# Altium PCB Urukul.PcbDoc (part 5 of 15)
Units mm, origin at the board's own origin, x right, y up, seen from the top; angles counter-clockwise.
Board outline 161.99 x 100 mm, 6 copper layers (L1, L2, L3, L4, P5, L6), stack 1.548 mm thick; 1078 components, 609 nets, 3798 pads, 2552 vias.
Unrouted connection lines stored in the file: 1.
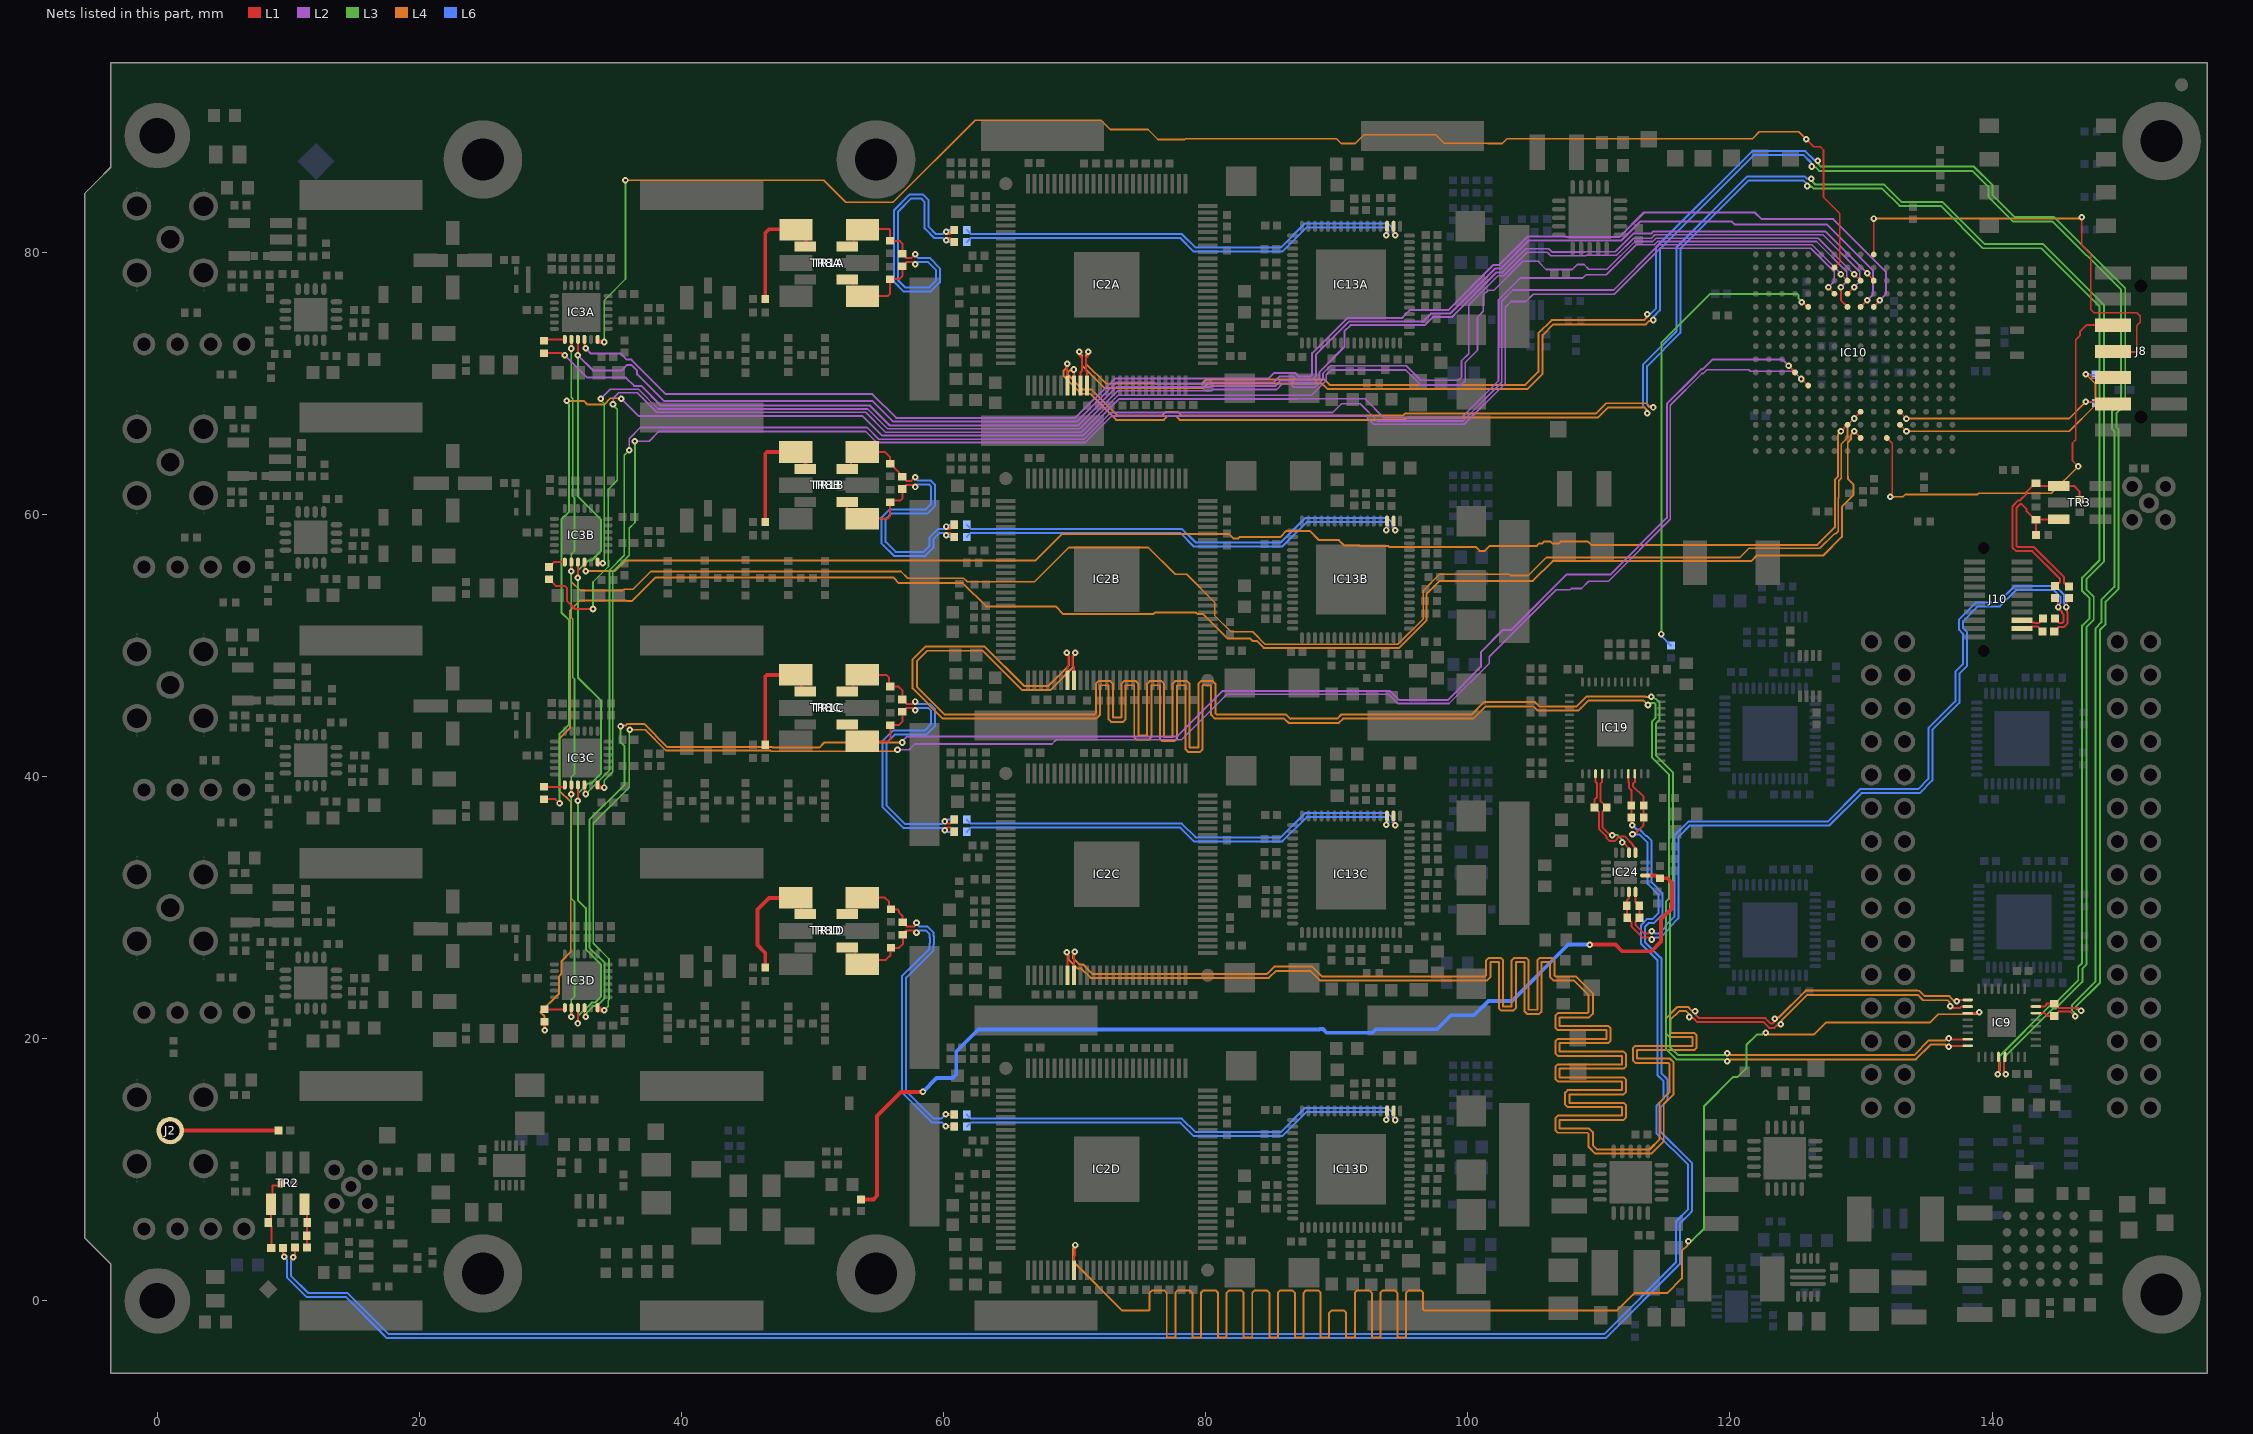
[diagram p8: the nets of this part, all layers, seen from the top]

## Part data (continued)
R136: library part R0603_7k5_1%_0.1W_100PPM, "Resistor - 1%", Case=0603, Manufacturer=GENERIC, Manufacturer1 ComponentHeight=0.55mm, Manufacturer1 Example="NIC COMPONENT", Manufacturer1 Part Number=NRC06F7501TRF, Manufacturer Part Number=R0603_7K5_1%_0.1W_100PPM, Power=0.1W, Tolerance=±1%, Author="CERN DEM JLC", Component Type=Standard, CreateDate=03.12.2007, HelpURL=\\cern.ch\dfs\Applications\Altium\Datasheets\R0603_NIC_NRC.pdf, LatestRevisionDate=13.03.2008, Mounted=Yes, Part Description="General Purpose Thick Film Chip Resistor", Part Number=R0603_7K5_1%_0.1W_100PPM, Pin Count=2, PressFit=No, Sense=No, SMD=Yes, Socket=No, Status=Preferred, TC=±100ppm/°C
R137A R137B R137C R137D: library part "R1206_100R_1%_0.5W_100PPM_VISHAY_CRCW-HP e3", "Resistor - 1%", Case=1206, Manufacturer="VISHAY DRALORIC", Manufacturer Part Number=CRCW1206100RFKEAHP, Power=0.5W, Tolerance=±1%, Voltage=200V, Author="CERN DEM JLC", ComponentHeight=0.65mm, Component Type=Standard, CreateDate=19.11.2013, HelpURL="\\cern.ch\dfs\Applications\Altium\Datasheets\R1206_VISHAY_CRCW-HP e3.pdf", LatestRevisionDate=19.11.2013, Mounted=Yes, Part Description="Pulse Proof, High Power Thick Film Chip Resistor", Part Number="R1206_100R_1%_0.5W_100PPM_VISHAY_CRCW-HP e3", Pin Count=2, PressFit=No, Sense=No, SMD=Yes, Socket=No, Status=None, TC=±100ppm/°C
R150 R151 R164: library part R0603_NO-VALUE, "Resistor", Case=0603, Author="CERN DEM JLC", Component Type=Standard, CreateDate=03.12.2007, HelpURL=Undefined, LatestRevisionDate=13.03.2008, Manufacturer=Undefined, Manufacturer1 ComponentHeight=Undefined, Manufacturer1 Example=Undefined, Manufacturer1 Part Number=Undefined, Manufacturer Part Number=R0603_NO-VALUE, Mounted=No, Part Description="Reserved Footprint For a 0603 (1608) Chip Resistor", Part Number=R0603_NO-VALUE, Pin Count=2, PressFit=No, Sense=No, SMD=Yes, Socket=No, Status=None
R166 R185 R186: library part R0603_47K_1%_0.1W_100PPM, "Resistor - 1%", Case=0603, Manufacturer=GENERIC, Manufacturer1 ComponentHeight=0.55mm, Manufacturer1 Example="NIC COMPONENT", Manufacturer1 Part Number=NRC06F4702TRF, Power=0.1W, Tolerance=±1%, Author="CERN DEM JLC", Component Type=Standard, CreateDate=03.12.2007, HelpURL=\\cern.ch\dfs\Applications\Altium\Datasheets\R0603_NIC_NRC.pdf, LatestRevisionDate=13.03.2008, Manufacturer Part Number=R0603_47K_1%_0.1W_100PPM, Mounted=Yes, Part Description="General Purpose Thick Film Chip Resistor", Part Number=R0603_47K_1%_0.1W_100PPM, Pin Count=2, Sense=No, SMD=Yes, Socket=No, Status=Preferred, TC=±100ppm/°C
R176: library part R0603_3K3_1%_0.1W_100PPM, "Resistor - 1%", Case=0603, Manufacturer=GENERIC, Manufacturer1 ComponentHeight=0.55mm, Manufacturer1 Example="NIC COMPONENT", Manufacturer1 Part Number=NRC06F3301TRF, Power=0.1W, Tolerance=±1%, Author="CERN DEM JLC", Component Type=Standard, CreateDate=03.12.2007, HelpURL=\\cern.ch\dfs\Applications\Altium\Datasheets\R0603_NIC_NRC.pdf, LatestRevisionDate=13.03.2008, Manufacturer Part Number=R0603_3K3_1%_0.1W_100PPM, Mounted=Yes, Part Description="General Purpose Thick Film Chip Resistor", Part Number=R0603_3K3_1%_0.1W_100PPM, Pin Count=2, PressFit=No, Sense=No, SMD=Yes, Socket=No, Status=Preferred, TC=±100ppm/°C
R194 R197: library part R0402_15K_1%_0.0625W_100PPM, "Resistor - 1%", Case=0402, Manufacturer=GENERIC, Manufacturer1 ComponentHeight=0.4mm, Manufacturer1 Example=VISHAY, Manufacturer1 Part Number=CRCW040215K0FK, Power=0.0625W, Tolerance=±1%, Author="CERN DEM JMW", Component Type=Standard, CreateDate=06.07.2015, HelpURL="\\cern.ch\dfs\Applications\Altium\Datasheets\R0402_VISHAY_CRCW e3.pdf", LatestRevisionDate=06.07.2015, Manufacturer Part Number=R0402_15K_1%_0.0625W_100PPM, Mounted=Yes, Part Description="General Purpose Thick Film Chip Resistor", Part Number=R0402_15K_1%_0.0625W_100PPM, Pin Count=2, PressFit=No, Sense=No, SMD=Yes, Socket=No, Status=None, TC=±100ppm/°C
R195: library part R0402_1K3_1%_0.0625W_100PPM, "Resistor - 1%", Case=0402, Manufacturer=GENERIC, Manufacturer1 ComponentHeight=0.4mm, Manufacturer1 Example="YAGEO PHYCOMP", Manufacturer1 Part Number=232270671302L, Power=0.0625W, Tolerance=±1%, Author="CERN DEM JLC", Component Type=Standard, CreateDate=03.12.2007, HelpURL=\\cern.ch\dfs\Applications\Altium\Datasheets\R0402_Phycomp_RC0402.pdf, LatestRevisionDate=17.10.2012, Manufacturer Part Number=R0402_1K3_1%_0.0625W_100PPM, Mounted=Yes, Part Description="General Purpose Thick Film Chip Resistor", Part Number=R0402_1K3_1%_0.0625W_100PPM, Pin Count=2, PressFit=No, Sense=No, SMD=Yes, Socket=No, Status="Not Recommended", TC=±100ppm/°C
R196: library part R0402_75K_1%_0.0625W_100PPM, "Resistor - 1%", Case=0402, Manufacturer=GENERIC, Manufacturer1 ComponentHeight=0.4mm, Manufacturer1 Example="YAGEO PHYCOMP", Manufacturer1 Part Number=232270677503L, Power=0.0625W, Tolerance=±1%, Author="CERN DEM JLC", Component Type=Standard, CreateDate=03.12.2007, HelpURL=\\cern.ch\dfs\Applications\Altium\Datasheets\R0402_Phycomp_RC0402.pdf, LatestRevisionDate=17.10.2012, Manufacturer Part Number=R0402_75K_1%_0.0625W_100PPM, Mounted=Yes, Part Description="General Purpose Thick Film Chip Resistor", Part Number=R0402_75K_1%_0.0625W_100PPM, Pin Count=2, PressFit=No, Sense=No, SMD=Yes, Socket=No, Status="Not Recommended", TC=±100ppm/°C
SW1: library part SW_OMRON_A6S-4102-H, "4 Ways SPST DIP Switch", Manufacturer=OMRON, Manufacturer Part Number=A6S-4102-H, Author="CERN DEM JMW", ComponentHeight=3.8mm, Component Type=Standard, CreateDate=25.09.2008, Family=Switch, HelpURL=\\cern.ch\dfs\Applications\Altium\Datasheets\SW_OMRON_A6S-4102-H.pdf, LatestRevisionDate=25.09.2008, Mounted=Yes, PackageDescription="Pitch 2.54mm, Body 11.3x6.4mm, 4 Ways SPST Surface-Mounting DIP Switch, OMRON A6S-H", Part Description="4 Ways SPST DIP Switch, White Flat Actuator with Seal Tape, Contact Rating 25mA 24VDC", Part Number=SW_OMRON_A6S-4102-H, Pin Count=8, PressFit=No, Sense=No, SMD=Yes, Socket=No, Status=None
T1: "P-CHANNEL MOSFET WITH DIODE", Case=SOT23-3, Manufacturer="ON SEMICONDUCTOR", Author="CERN DEM JLC", Bonding=No, ComponentHeight=1.1mm, Component Type=Standard, CreateDate=29.03.2012, Device=BSS84LT1G, HelpURL=\\cern.ch\dfs\Applications\Altium\Datasheets\BSS84LT1G.pdf, LatestRevisionDate=29.03.2012, Manufacturer Part Number=BSS84LT1G, Mounted=Yes, PackageDescription="SOT23 3-Leads, Pitch 0.95mm - Body 1.4x3mm, IPC Medium Density", Part Description="50V 130mA Single P-Channel Power MOSFET", Part Number=BSS84LT1G, Pin Count=3, PressFit=No, Sense=No, SMD=Yes, Socket=No
TP0 TP1 TP2 TP3 TP4 TP5 TP6 TP7 TP8 TP10 TP11 TP12 TP13 TP14 TP15 TP16 TP17 TP18: library part SMD_PAD_1.27X1.27MM, Author="CERN DEM JLC", ComponentHeight=0mm, Component Type="Standard (No BOM)", CreateDate=12.01.2008, Family="Test Point", HelpURL=Undefined, LatestRevisionDate=12.01.2008, Mounted=No, PackageDescription="1.27mm x 1.27mm PCB Copper Area (SMD Test Point)", Part Description="1.27mm x 1.27mm PCB Copper Area (SMD Test Point)", Part Number=SMD_PAD_1.27X1.27MM, Pin Count=1, Sense=No, SMD=Yes, Socket=No, Status=None
TR1A TR1B TR1C TR1D: library part XFMR_MINI-CIRCUITS_ADT1-1WT+, "75 Ohm 0.4 To 800MHz RF Transformers", Manufacturer=MINI-CIRCUITS, Manufacturer Part Number=ADT1-1WT+, Author="CERN DEM JLC", ComponentHeight=2.84mm, Component Type=Standard, CreateDate=21.09.2011, HelpURL=\\cern.ch\dfs\Applications\Altium\Datasheets\XFMR_MINI-CIRCUITS_ADT1-1WT+.pdf, LatestRevisionDate=21.09.2011, Mounted=Yes, Part Description="75 Ohms 0.4 to 800 MHz RF Transformer", Part Number=XFMR_MINI-CIRCUITS_ADT1-1WT+, Pin Count=6, Sense=No, SMD=Yes, Socket=No, Status=None
TR2 TR3: library part XFMR_MINI-CIRCUITS_TCM2-43X+, "50 OHMS 10 to 4000 MHz RF Transformer", Manufacturer=MINI-CIRCUITS, Manufacturer Part Number=TCM2-43X+, Power=0.4W, Author="CERN DEM BC", ComponentHeight=4.06mm, Component Type=Standard, CreateDate=2016-02-12, HelpURL=\\cern.ch\dfs\Applications\Altium\Datasheets\XFMR_MINI-CIRCUITS_TCM2-43X+.pdf, LatestRevisionDate=2016-02-12, Mounted=Yes, Part Description="50 Ohms 10 to 4000MHz RF Transformer", Part Number=XFMR_MINI-CIRCUITS_TCM2-43X+, Pin Count=6, Sense=No, SMD=Yes, Socket=No, Status=None
TR4 TR5 TR6 TR7: library part XFMR_MINI-CIRCUITS_TC1-1+, "50 Ohm 1.5 To 500MHz RF Transformers", Manufacturer=MINI-CIRCUITS, Manufacturer Part Number=TC1-1+, Author="CERN DEM JLC", ComponentHeight=4.06mm, Component Type=Standard, CreateDate=08/02/2010, HelpURL=\\cern.ch\dfs\Applications\Altium\Datasheets\XFMR_MINI-CIRCUITS_TC1-1+.pdf, LatestRevisionDate=27/04/2010, Mounted=Yes, Part Description="50 Ohms 1.5 to 500 MHz RF Transformer", Part Number=XFMR_MINI-CIRCUITS_TC1-1+, Pin Count=5, Sense=No, SMD=Yes, Socket=No, Status=None
TR8A TR8B TR8C TR8D: library part XFMR_MINI-CIRCUITS_TC1-1T-152X+, "50 Ohms 5 To 1500MHz TLT RF Transformer", Manufacturer=MINI-CIRCUITS, Manufacturer Part Number=TC1-1T-152X+, Author=GK, Component Type=Standard, ComponentHeight=4.06mm, CreateDate=10.08.2016, HelpURL=\\cern.ch\dfs\Applications\Altium\Datasheets\XFMR_MINI-CIRCUITS_TC1-1-43X+.pdf, LatestRevisionDate=10.08.2016, Mounted=Yes, Part Description="50 Ohms 5 To 1500MHz TLT RF Transformer", Part Number=XFMR_MINI-CIRCUITS_TC1-1T-152X+, Pin Count=5, Sense=No, SMD=Yes, Socket=No, Status=None
WASHER4 WASHER6 WASHER7 WASHER8 WASHER9: library part Keystone_7687, "SMA_Shoulder Washer", Author=GK, Component Type=Mechanical, ComponentHeight=1.91mm, CreateDate=28.01.2016, HelpURL=\\cern.ch\dfs\Applications\Altium\Datasheets\AAVID-THERMALLOY_7721-7PPSG.pdf, LatestRevisionDate=28.01.2016, Manufacturer="Custom 3D printed", Manufacturer Part Number="Custom 3D printed", Mounted=Yes, PackageDescription="Polyphenylene Sulfide PPS Shoulder Washer", Part Description="Polyphenylene Sulfide PPS Shoulder Washer", Part Number="Custom 3D printed", Pin Count=0, PressFit=No, Sense=No, SMD=No, Socket=No, Status=None
NT1 NT2 NT3 NT4 NT5 NT6 NT7 NT8 NT9 NT10 NT11 NT12 NT13 NT14 NT15 NT16 NT17 NT18 NT19 NT20: Author="CERN DEM JLC", Component Type="Net Tie", ComponentHeight=0mm, CreateDate=22.03.2011, Family="Net Tie", HelpURL=Undefined, LatestRevisionDate=22.03.2011, Mounted=No, PackageDescription="2 Plated Through Hole For Coaxial Cable Link: Hole Dia.=1.4mm Pad Dia.=2.5mm", Part Description="Net Tie (2 Nets)", Part Number="Net Tie", Pin Count=2, Sense=No, SMD=No, Socket=No, Status=None

## Free pads (board coordinates)
  round 6 hole 3.2: 0(54.844,2.088) 0(152.944,0.488) 0(152.944,88.488) 1(54.844,87.088) 2(24.844,87.088) 3(24.844,2.088)

## Via types
v1: diameter 0.5, hole 0.2, L1 to L6, tented both sides, 1964 vias
v2: diameter 0.5, hole 0.2, L1 to L6, 480 vias
v3: diameter 0.6, hole 0.3, L1 to L6, tented both sides, 52 vias
v4: diameter 0.6, hole 0.3, L1 to L6, 36 vias
v5: diameter 0.762, hole 0.508, L1 to L6, tented both sides, 20 vias

## Nets (pads, with @x,y where several pads share a name; then routed paths per layer and width w, separated by ;. In a path a pad name is that pad's centre, name@x,y a point inside that pad or via, vN(x,y) a via of type N, cw(c..) or ccw(c..) an arc to the next point about the centre after c; other vN are vias at no path point)
ATT_CLK: IC3A.21 IC3B.21 IC3C.21 IC3D.21 IC10.E9 | length 174.3
  L1 w0.152: v1(32.094,21.163) IC3D.21@32.094,22.363 ; v1(32.094,38.163) IC3C.21@32.094,39.363 ; v1(32.094,55.163) IC3B.21@32.094,56.363 ; v1(32.094,72.163) IC3A.21@32.094,73.363 ; IC10.E9@129.97,75.841 v1(130.47,76.341)
  L2 w0.152: v1(32.094,72.163) 33.269,70.988 35.428,70.988 35.828,71.388 36.199,71.388 36.62,70.968 36.62,70.687 38.644,68.663 54.564,68.663 56.144,67.083 70.16,67.083 73.161,70.084 76.081,70.084 76.173,69.992 80.233,69.992 80.325,70.084 85.189,70.084 85.623,70.519 86.699,70.519 86.953,70.265 88.115,70.265 88.404,70.554 88.404,72.191 90.943,74.73 96.599,74.73 97.202,75.334 98.643,75.334 102.071,78.762 102.513,78.762 104.667,80.916 106.982,80.916 106.992,80.906 111.699,80.906 113.134,82.341 120.152,82.341 120.355,82.138 127.373,82.138 130.923,78.587 130.923,76.794 v1(130.47,76.341)
  L3 w0.152: v1(32.094,21.163) 32.094,21.706 33.143,22.755 33.398,22.755 33.847,23.205 33.847,25.676 32.694,26.829 32.694,29.962 32.094,30.561 v1(32.094,38.163) 32.094,38.706 32.876,39.489 33.131,39.489 33.847,40.205 33.847,45.808 32.094,47.561 v1(32.094,55.163) 32.094,55.706 32.876,56.489 33.131,56.489 33.847,57.205 33.847,57.622 33.847,58.122 33.847,58.622 33.847,59.122 33.847,59.622 32.094,61.375 v1(32.094,72.163)
ATT_LE0: IC3A.22 IC10.E10 | length 114.7
  L1 w0.152: IC3A.22@32.594,73.363 32.594,72.774 v1(32.698,72.67) ; IC10.E10@130.97,75.841 130.97,75.854 131.35,76.234 v1@131.35,76.341
  L2 w0.152: v1(32.698,72.67) 33.094,72.274 35.39,72.274 35.39,72.251 35.828,71.813 36.169,71.813 38.794,69.188 54.564,69.188 56.38,67.373 70.055,67.373 73.045,70.363 84.778,70.363 85.212,70.798 86.815,70.798 87.068,70.544 88,70.544 88.125,70.67 88.125,72.307 90.828,75.009 94.995,75.009 95.599,75.613 98.527,75.613 101.955,79.041 102.397,79.041 104.552,81.195 107.476,81.195 107.486,81.185 111.584,81.185 113.442,83.044 121.908,83.044 122.421,82.531 127.895,82.531 131.897,78.528 131.897,76.794 v1(131.444,76.341)
ATT_LE1: IC3B.22 IC10.P8 | length 107.5
  L1 w0.152: IC3B.22@32.594,56.363 32.594,55.774 v1(32.698,55.67) ; v1(128.47,66.351) 128.475,66.351 128.965,66.841 IC10.P8@128.97,66.841
  L4 w0.152: v1(32.698,55.67) 34.918,55.67 35.731,56.483 66.999,56.483 69.037,58.522 81.77,58.522 82.106,58.185 82.482,58.185 82.589,58.293 85.708,58.293 86.16,58.745 87.938,58.745 88.641,58.042 90.165,58.042 90.576,57.631 91.724,57.631 91.748,57.607 93.921,57.607 93.994,57.534 100.599,57.534 100.904,57.229 101.279,57.229 101.657,57.607 102.782,57.607 105.26,57.607 105.444,57.791 105.688,57.791 105.843,57.946 106.301,57.946 106.457,57.791 106.954,57.791 107.106,57.943 109.164,57.943 109.424,57.682 126.672,57.682 128.002,59.013 128.002,61.354 128.032,61.384 128.032,62.681 128.231,62.881 128.231,66.088 128.47,66.327 v1(128.47,66.351)
ATT_LE2: IC3C.22 IC10.C8 | length 134.9
  L1 w0.127: v1(128.47,78.341) IC10.C8@128.97,77.841
  L1 w0.152: IC3C.22@32.594,39.363 32.594,38.774 v1(32.698,38.67)
  L2 w0.127: v1(36.004,64.888) 36.003,65.778 36.86,66.635 54.168,66.635 55.052,65.751 70.712,65.751 72.74,67.779 89.685,67.779 90.359,68.453 91.787,68.453 93.107,67.133 99.626,67.133 102.595,70.101 102.595,76.282 103.44,77.128 111.129,77.128 114.573,80.572 126.266,80.572 128.47,78.368 v1(128.47,78.341)
  L3 w0.127: v1(32.698,38.67) 34.499,40.471 34.499,55.746 35.634,56.88 35.634,64.518 v1(36.004,64.888)
ATT_LE3: IC3D.22 IC10.K4 | length 134.9
  L1 w0.152: IC3D.22@32.594,22.363 32.594,21.774 v1(32.698,21.67) ; v1(124.47,71.359) 124.47,71.35 124.97,70.85 IC10.K4@124.97,70.841
  L2 w0.152: v1(56.839,42.6) 56.839,42.695 57.214,43.07 77.834,43.07 81.309,46.545 94.049,46.545 94.756,45.838 98.45,45.838 100.986,48.374 100.986,49.502 102.669,51.184 103.295,51.184 107.519,55.409 110.853,55.409 115.189,59.745 115.189,68.451 117.152,70.414 117.826,71.088 117.928,71.088 118.652,71.812 124.017,71.812 v1(124.47,71.359)
  L3 w0.152: v1(32.698,21.67) 32.761,21.733 32.761,21.979 33.259,22.476 33.513,22.476 34.126,23.089 34.126,25.792 32.973,26.945 32.973,36.702 35.657,39.386 35.657,42.301 35.348,42.611 v1(35.348,43.846)
  L4 w0.152: v1(35.348,43.846) 35.414,43.912 35.747,43.912 35.856,44.021 37.145,44.021 38.912,42.255 46.919,42.255 46.955,42.219 46.964,42.21 50.507,42.21 50.896,42.6 v1(56.839,42.6)
ATT_RSTN: IC3A.20 IC3B.20 IC3C.20 IC3D.20 IC10.N9 | length 172.6
  L1 w0.127: v1@129.47,67.292 129.47,67.332 129.97,67.832 IC10.N9@129.97,67.841
  L1 w0.152: v1(31.594,21.663) IC3D.20@31.594,22.363 ; v1(31.594,38.663) IC3C.20@31.594,39.363 ; v1(31.594,55.663) IC3B.20@31.594,56.363 ; v1(31.594,72.663) IC3A.20@31.594,73.363
  L3 w0.127: v1(31.594,21.663) 31.594,22.97 31.834,23.21 31.834,30.444 31.594,30.684 31.594,38.641 31.616,38.663 31.594,38.685 31.594,39.97 31.834,40.21 31.834,47.444 31.692,47.586 31.692,52.03 31.594,52.128 31.594,55.641 31.616,55.663 31.594,55.685 31.594,56.97 31.834,57.21 31.834,61.257 31.692,61.4 31.692,68.842 31.594,68.94 v1(31.594,72.663)
  L4 w0.127: v1(31.594,55.663) 31.594,54.868 32.264,54.198 35.501,54.198 35.609,54.305 36.297,54.305 37.643,55.651 56.744,55.651 57.252,55.143 61.519,55.143 61.789,54.873 66.938,54.873 69.546,57.481 70.626,57.481 70.628,57.48 71.26,57.48 71.262,57.481 75.615,57.481 77.666,55.43 78.552,55.43 80.674,53.308 80.674,52.292 81.922,51.045 83.577,51.045 84.526,50.096 94.652,50.096 96.586,52.03 96.586,54.185 97.832,55.43 98.716,55.43 98.729,55.443 103.137,55.443 103.237,55.343 104.602,55.343 105.972,56.713 120.749,56.713 121.452,57.416 126.848,57.416 127.973,58.541 128.082,58.541 128.269,58.727 128.269,61.244 128.299,61.274 128.299,62.571 128.498,62.77 128.498,65.379 128.965,65.846 128.965,66.818 v1(129.47,67.324)
ATT_S_IN0: IC3A.24 IC10.B7 | length 120.3
  L1 w0.127: v1(125.831,88.62) 126.384,88.066 126.878,88.066 127.136,87.808 127.136,84.215 128.386,82.966 128.386,79.256 IC10.B7@127.97,78.841
  L1 w0.3: IC3A.24@33.594,73.363 33.582,73.352 33.771,73.163 v1(34.094,73.163)
  L3 w0.127: v1(34.094,73.163) 34.094,76.333 35.723,77.962 v1(35.723,85.499)
  L4 w0.127: v1(35.723,85.499) 50.847,85.499 52.527,83.819 56.134,83.819 62.407,90.093 72.002,90.093 72.721,89.373 73.09,89.373 73.099,89.382 75.59,89.382 76.36,88.611 78.399,88.611 78.458,88.67 89.983,88.67 90.345,88.308 91.405,88.308 92.08,88.983 97.563,88.983 98.208,88.338 101.511,88.338 101.54,88.308 102.626,88.308 102.988,88.67 121.716,88.67 122.24,89.194 125.257,89.194 v1(125.831,88.62)
ATT_S_IN1: IC3B.24 IC10.D8 | length 124.7
  L1 w0.127: IC10.D8@128.97,76.841 129.408,77.279 v1@129.47,77.279
  L1 w0.3: IC3B.24@33.594,56.363 33.594,56.303 33.952,56.303 v1(33.99,56.265)
  L2 w0.127: v1(33.847,68.84) 34.554,69.548 36.712,69.548 38.211,68.049 54.207,68.049 55.718,66.538 70.386,66.538 73.294,69.446 80.459,69.446 80.551,69.539 85.415,69.539 85.849,69.973 86.473,69.973 86.727,69.72 88.341,69.72 88.95,70.328 88.95,70.766 89.524,71.34 95.303,71.34 96.405,70.238 99.282,70.238 99.521,70.476 99.521,71.719 100.069,72.268 100.069,75.988 102.297,78.216 102.739,78.216 104.533,80.01 106.056,80.01 106.323,79.744 109,79.744 109.038,79.781 111.346,79.781 112.651,81.087 114.01,81.087 114.258,81.334 127.099,81.334 129.91,78.523 129.91,77.781 v1(129.47,77.341)
  L3 w0.127: v1(33.847,68.84) 33.847,68.739 34.114,68.473 34.114,56.489 33.99,56.366 v1(33.99,56.265)
ATT_S_IN2: IC3C.24 IC10.D7 | length 133
  L1 w0.127: v1(127.515,77.35) 127.515,77.323 127.97,76.868 IC10.D7@127.97,76.841
  L1 w0.3: IC3C.24@33.594,39.363 33.59,39.359 33.786,39.163 v1(34.094,39.163)
  L2 w0.127: v1(36.444,65.596) 37.529,65.596 38.262,66.329 54.055,66.329 54.887,65.497 70.817,65.497 72.836,67.516 92.191,67.516 92.829,66.879 99.731,66.879 102.849,69.996 102.849,75.806 103.29,76.247 104.441,76.247 105.001,76.807 111.167,76.807 114.678,80.318 126.161,80.318 127.956,78.523 127.956,77.791 v1(127.515,77.35)
  L3 w0.127: v1(34.094,39.163) 34.094,39.706 34.753,40.366 34.753,55.641 36.003,56.891 36.003,58.948 36.444,59.388 36.444,62.483 v1(36.444,65.596)
ATT_S_IN3: IC3D.24 IC10.L5 | length 132.9
  L1 w0.127: v1(125.431,70.338) 125.452,70.338 125.949,69.841 IC10.L5@125.97,69.841
  L1 w0.3: IC3D.24@33.594,22.363 33.644,22.413 33.894,22.163 v1(34.094,22.163)
  L2 w0.127: v1(56.479,42.038) 57.371,42.038 57.821,42.488 68.271,42.488 68.587,42.804 78.149,42.804 81.624,46.279 93.939,46.279 94.646,45.571 98.561,45.571 101.622,48.633 101.622,49.134 106.738,54.251 107.793,54.251 107.889,54.347 108.672,54.347 109.235,54.909 110.731,54.909 115.456,59.635 115.456,68.341 117.867,70.752 117.969,70.752 118.25,71.033 121.443,71.033 121.557,70.918 124.851,70.918 v1(125.431,70.338)
  L3 w0.127: v1(34.094,22.163) 34.403,22.473 34.403,22.896 34.468,22.96 34.468,26.077 33.274,27.271 33.274,36.434 36.003,39.164 36.003,43.528 v1(36.044,43.568)
  L4 w0.127: v1(36.044,43.568) 37.221,43.568 38.802,41.988 46.809,41.988 46.853,41.944 56.313,41.944 56.408,42.038 v1(56.479,42.038)
ATT_S_OUT0: IC10.C10 R100.1 | length 112.8
  L1 w0.152: R100.1@29.51,72.304 30.834,72.304 31,72.138 v1(31.094,72.138) ; v1@130.47,78.343 130.497,78.343 130.97,77.87 IC10.C10@130.97,77.841
  L2 w0.152: v1(31.094,72.138) 32.791,70.441 35.75,70.441 36.377,69.814 36.912,69.814 38.411,68.316 54.358,68.316 55.87,66.804 70.275,66.804 73.184,69.713 80.348,69.713 80.441,69.805 85.304,69.805 85.739,70.24 86.584,70.24 86.837,69.986 88.231,69.986 88.683,70.438 88.683,70.876 90.584,72.777 90.584,73.976 91.059,74.451 96.715,74.451 97.318,75.055 98.758,75.055 102.186,78.483 102.628,78.483 104.422,80.277 106.167,80.277 106.433,80.01 108.89,80.01 108.927,80.048 111.235,80.048 112.623,81.435 113.982,81.435 114.147,81.601 127.269,81.601 v1(130.47,78.4)
ATT_S_OUT1: IC10.C9 R169.1 | length 131
  L1 w0.127: v1(129.47,78.341) IC10.C9@129.97,77.841
  L1 w0.152: R169.1@29.898,55.053 30.39,54.561 31.094,54.561 31.247,54.408 31.247,53.413 31.872,52.788 v1(33.244,52.788)
  L2 w0.127: v1(34.77,68.416) 34.793,68.439 34.793,68.866 35.208,69.281 36.62,69.281 38.105,67.795 54.055,67.795 55.567,66.284 70.491,66.284 73.299,69.092 88.073,69.092 89.204,70.223 89.204,70.661 89.565,71.022 95.262,71.022 96.398,69.886 99.483,69.886 99.794,70.197 99.794,71.597 100.732,72.535 100.732,75.046 101.185,75.499 101.185,76.745 101.551,77.111 101.993,77.111 104.194,79.313 105.355,79.313 105.97,78.698 107.976,78.698 108.357,79.079 108.859,79.079 109.237,78.701 110.624,78.701 112.756,80.833 114.115,80.833 114.363,81.08 126.73,81.08 v1(129.47,78.341)
  L3 w0.127: v1(33.244,52.788) 33.244,54.849 34.431,56.036 34.431,56.503 34.403,56.531 34.403,61.904 35.106,62.606 35.106,68.026 34.77,68.361 v1(34.77,68.416)
ATT_S_OUT2: IC10.E8 R170.1 | length 147
  L1 w0.152: R170.1@29.51,38.278 30.376,38.278 v1(30.692,37.962) ; v1(128.47,77.35) 128.47,76.341 IC10.E8@128.97,75.841
  L2 w0.127: 86.973,68.826 92.149,68.826 93.588,67.387 99.521,67.387 102.341,70.207 102.341,76.388 103.996,78.043 108.772,78.043 109.015,78.286 110.569,78.286 112.862,80.579 114.22,80.579 114.468,80.826 126.607,80.826 128.911,78.523 128.911,77.791 v1(128.47,77.35)
  L2 w0.152: v1(35.39,68.84) 36.702,67.529 53.795,67.529 55.306,66.017 70.601,66.017 73.41,68.826 86.973,68.826
  L3 w0.152: v1(30.692,37.962) 30.692,43.271 31.426,44.004 31.426,51.92 30.841,52.504 30.841,59.622 31.426,60.206 31.426,68.391 31.245,68.572 v1(31.245,68.666)
  L4 w0.152: v1(31.245,68.666) 32.548,68.666 32.826,68.387 34.094,68.387 34.576,68.869 35.362,68.869 v1(35.39,68.84)
ATT_S_OUT3: IC10.R9 R147.1 | length 149.3
  L1 w0.152: v1@29.594,20.663 R147.1@29.594,21.363 ; v1@129.564,66.351 v1(129.47,66.351) 129.47,66.341 IC10.R9@129.97,65.841
  L4 w0.152: v1(29.554,20.638) 29.554,21.695 29.235,22.013 30.632,23.41 30.632,24.74 30.841,24.948 30.841,25.916 31.547,26.622 31.547,38.07 30.683,38.933 30.683,42.901 31.496,43.713 31.496,52.68 32.258,53.441 35.75,53.441 35.806,53.385 36.215,53.385 38.003,55.173 56.18,55.173 56.591,54.762 61.468,54.762 63.243,52.988 68.549,52.988 69.142,52.395 76,52.395 76.121,52.516 79.257,52.516 79.378,52.395 79.81,52.395 81.687,50.518 83.41,50.518 83.566,50.363 83.882,50.363 84.415,49.83 94.763,49.83 96.853,51.92 96.853,53.944 97.844,54.935 104.956,54.935 106.468,56.446 107.489,56.446 121.614,56.446 122.039,56.871 127.115,56.871 128.535,58.291 128.535,60.596 129.441,61.502 129.441,61.878 129.423,61.896 129.423,62.022 129.442,62.04 129.442,62.284 128.989,62.737 128.989,62.89 128.988,65.493 129.231,65.736 129.231,66.088 129.47,66.327 v1(129.47,66.351)
ATT_S_OUTA: IC3A.19 R100.2 | length 1.6
  L1 w0.152: R100.2@29.51,73.244 29.629,73.363 IC3A.19@31.094,73.363
ATT_S_OUTB: IC3B.19 R169.2 | length 1.3
  L1 w0.152: R169.2@29.898,55.993 30.268,56.363 IC3B.19@31.094,56.363
ATT_S_OUTC: IC3C.19 R170.2 | length 1.7
  L1 w0.152: R170.2@29.51,39.218 31.026,39.218 31.094,39.287 IC3C.19@31.094,39.363
ATT_S_OUTD: IC3D.19 R147.2 | length 1.7
  L1 w0.152: R147.2@29.554,22.244 31.092,22.244 31.094,22.246 IC3D.19@31.094,22.363
CFG_TCK: IC10.P12 J8.6 R67.1 | length 21.5
  L1 w0.127: IC10.P12@132.97,66.841 v1(133.47,66.341) ; v1(147.159,70.713) 147.396,70.713 147.669,70.44 J8.6@149.244,70.44
  L4 w0.127: v1(133.47,66.341) 145.884,66.341 147.894,68.351 147.894,69.978 v1(147.159,70.713)
  L6 w0.127: v1@147.153,70.663 R67.1@147.874,70.663
CFG_TDI: IC10.R11 J8.10 | length 33.5
  L1 w0.127: IC10.R11@131.97,65.841 132.386,65.425 132.386,61.607 132.22,61.442 v1(132.22,61.341) ; v1(146.569,63.663) 146.144,64.089 146.144,65.456 146.394,65.706 146.394,73.34 146.719,73.665
  L1 w0.152: 146.719,73.665 146.719,73.965 147.194,74.44 J8.10@149.244,74.44
  L4 w0.127: v1(132.22,61.341) 133.189,61.341 133.379,61.531 138.908,61.531 138.986,61.609 144.515,61.609 v1(146.569,63.663)
CFG_TDO: IC10.A10 J8.8 | length 34.6
  L1 w0.127: IC10.A10@130.97,79.841 v1(130.97,82.581) ; v1(146.834,82.686) 146.834,80.54 147.532,79.842 147.532,79.377 147.532,75.64 147.779,75.393 151.045,75.393 151.302,75.136 151.302,74.678 151.045,74.421 151.045,72.467 150.971,72.393 149.291,72.393 J8.8@149.244,72.44
  L4 w0.127: v1(130.97,82.581) 146.729,82.581 v1(146.834,82.686)
CFG_TMS: IC10.N12 J8.4 R66.1 | length 18
  L1 w0.127: IC10.N12@132.97,67.841 132.97,67.815 133.468,67.317 v1(133.468,67.291) ; v1(147.159,68.593) 149.091,68.593 J8.4@149.244,68.44
  L4 w0.127: v1(133.468,67.291) 133.506,67.329 145.895,67.329 v1(147.159,68.593)
  L6 w0.127: v1(147.159,68.593) R66.1@148.007,68.593
CK_MMCX_IN_N: C194.1 C195.1 R45.2 TR3.4 | length 13.5
  L1 w0.152: C195.1@143.291,59.586 143.349,59.527 R45.2@143.349,58.438 ; C195.1@143.34,59.592 143.285,59.592 142.635,60.241 142.635,60.403 142.257,60.781 142.131,60.781 141.866,60.516 141.866,57.59 141.955,57.501 143.202,57.501 145.499,55.203 145.499,54.786 145.589,54.697 145.685,54.697 C194.1@145.869,54.513 ; C195.1@143.34,59.635 TR3.4@145.097,59.635
CK_MMCX_IN_P: C189.1 C191.2 R73.2 TR3.6 | length 15.4
  L1 w0.152: C189.1@144.794,54.538 145.028,54.772 145.105,54.772 145.195,54.861 145.195,55.077 143.076,57.196 141.829,57.196 141.561,57.464 141.561,60.642 142.005,61.085 142.131,61.085 142.635,61.589 142.635,61.751 143.285,62.401 C191.2@143.34,62.401 143.566,62.175 TR3.6@145.097,62.175 146.258,62.175 146.687,61.745 R73.2@146.687,61.125
CK_MMCX_N: C194.2 C214.1 IC24.4 R47.1 R163.2 | length 61.1
  L1 w0.152: IC24.4@112.793,31.196 112.793,30.423 R47.1@113.071,30.144 113.097,30.119 R163.2@113.097,29.23 113.097,29.21 112.883,28.996 112.868,28.996 112.779,28.907 112.779,28.691 113.436,28.034 113.789,28.034 113.95,28.195 v1(114.044,28.195) ; C214.1@144.744,51.063 144.978,51.297 144.978,51.311 145.067,51.4 145.47,51.4 145.737,51.668 145.737,52.51 145.736,52.512 145.736,52.872 v1(145.669,52.938) 145.669,53.413 C194.2@145.869,53.613
  L6 w0.152: v1(114.044,28.195) 114.138,28.195 114.299,28.034 114.577,28.034 115.09,28.548 115.09,28.643 115.755,29.308 115.755,35.505 116.82,36.571 127.451,36.571 129.924,39.043 134.356,39.043 135.144,39.831 135.144,43.694 137.195,45.745 137.195,47.983 137.769,48.557 137.769,50.915 137.489,51.194 137.489,51.99 138.792,53.292 140.473,53.292 141.724,54.543 144.82,54.543 145.508,53.855 145.508,53.193 145.669,53.032 v1(145.669,52.938)
CK_MMCX_P: C189.2 C213.1 IC24.3 R47.2 R163.1 | length 60.7
  L1 w0.152: IC24.3@112.293,31.196 112.293,30.703 112.157,30.567 R163.1@112.157,29.23 112.157,29.21 112.371,28.996 112.385,28.996 112.474,28.907 112.474,28.565 113.31,27.73 113.789,27.73 113.95,27.568 v1(114.044,27.568) ; C213.1@144.794,52.063 145.028,51.829 145.028,51.795 145.117,51.705 145.343,51.705 145.433,51.795 145.433,52.383 145.324,52.492 145.324,52.584 145.042,52.866 v1(145.042,52.938) 145.028,52.952 145.028,53.404 C189.2@144.794,53.638
  L6 w0.152: v1(114.044,27.568) 114.138,27.568 114.299,27.73 114.703,27.73 115.395,28.421 115.395,28.517 116.06,29.182 116.06,35.379 116.947,36.266 127.578,36.266 130.05,38.738 134.482,38.738 135.449,39.705 135.449,43.568 137.5,45.619 137.5,47.857 138.074,48.431 138.074,51.041 137.794,51.32 137.794,51.863 138.918,52.987 140.599,52.987 141.85,54.238 144.694,54.238 145.203,53.729 145.203,53.193 145.042,53.032 v1(145.042,52.938)
CK_OSC: C103.1 IC24.6 R162.1 | length 81.1
  L1 w0.298: C103.1@53.699,7.741 54.647,7.741 54.919,8.013 54.919,14.113 56.752,15.946 v1(58.423,15.946) ; v1@109.349,27.149 109.377,27.177 111.262,27.177 111.768,26.67 114.009,26.67 114.744,27.405 114.744,29.12 115.571,29.947 115.571,31.889 115.22,32.24 R162.1@114.659,32.24 114.529,32.369 114.398,32.369 114.321,32.446 IC24.6@113.918,32.446
  L6 w0.298: v1(58.423,15.946) 59.466,16.988 60.669,16.988 60.964,17.283 60.964,19.013 62.639,20.688 88.644,20.688 88.7,20.744 88.938,20.744 89.229,20.453 92.727,20.453 92.995,20.721 97.648,20.721 98.716,21.788 100.461,21.788 101.564,22.891 103.36,22.891 107.661,27.193 108.727,27.193 108.743,27.177 v1(109.294,27.177)
CK_SMA_IN: C196.1 J2.1 | length 8.3
  L1 w0.298: J2.1@0.984,12.988 C196.1@9.244,12.988
CK_SMA_IN_N: C80.1 C81.1 R81.2 TR2.4 | length 3.4
  L1 w0.152: TR2.4@11.214,7.373 11.419,7.168 11.419,5.963 11.419,4.963 C81.1@11.419,4.063
CK_SMA_IN_P: C54.1 C69.2 R46.2 TR2.6 | length 5.7
  L1 w0.152: C54.1@8.694,4.038 8.694,5.723 C69.2@8.454,5.963 8.674,6.183 TR2.6@8.674,7.373 8.805,7.504 8.805,8.785 9.296,8.785 R46.2@9.474,8.963
CK_SMA_N: C81.2 IC19.20 R22.2 R52.1 | length 154.8
  L1 w0.152: v1@10.197,3.155 v1(10.358,3.316) 10.519,3.477 C81.2@10.519,4.063 ; v1@112.601,35.489 112.563,35.528 v1(112.563,35.605) 112.717,35.605 113.414,36.302 R22.2@113.414,36.888 R52.1@113.414,37.788 113.414,38.452 112.598,39.268 112.598,39.441 112.744,39.587 IC19.20@112.744,40.213
  L6 w0.152: v1(10.358,3.316) 10.194,3.152 10.194,1.919 11.536,0.577 14.53,0.577 14.619,0.488 17.649,-2.542 110.393,-2.542 115.882,2.947 115.882,6.053 116.817,6.988 116.817,10.365 114.389,12.793 114.389,14.864 114.944,15.419 114.944,16.738 114.473,17.21 114.473,25.849 114.473,25.979 113.214,27.237 113.214,28.664 113.696,29.146 114.093,29.146 114.535,29.588 114.535,30.986 113.714,31.807 113.714,34.966 113.089,35.591 112.576,35.591 112.563,35.578 v1(112.563,35.605)
CK_SMA_P: C54.2 IC19.19 R22.1 R52.2 | length 154.5
  L1 w0.152: v1@9.594,3.452 C54.2@9.594,4.038 ; IC19.19@112.244,40.213 112.244,39.587 112.293,39.538 112.293,39.141 112.474,38.961 R52.2@112.474,37.788 R22.1@112.474,36.888 v1@112.474,36.302
  L6 w0.152: v1(9.689,3.358) 9.88,3.168 9.88,2.498 9.889,2.488 9.889,1.793 11.41,0.273 14.403,0.273 17.222,-2.545 17.523,-2.847 110.519,-2.847 116.187,2.821 116.187,5.927 117.033,6.773 117.122,6.862 117.122,10.491 117.033,10.581 114.694,12.919 114.694,14.738 115.249,15.293 115.249,16.864 115.157,16.956 115.157,16.967 114.785,17.339 114.785,25.979 114.785,26.108 114.699,26.194 114.688,26.194 113.519,27.363 113.519,28.538 113.822,28.841 114.219,28.841 114.84,29.462 114.84,31.112 114.019,31.933 114.019,35.092 113.635,35.476 ; v1(112.551,36.291) 112.877,35.965 113.111,35.965 113.617,35.458
CLK_DIV: IC10.E5 R155.1 | length 36.8
  L1 w0.152: v1(125.47,76.2) 125.54,76.2 125.9,75.841 IC10.E5@125.97,75.841
  L3 w0.152: v1(114.76,50.877) 114.76,73.118 118.483,76.84 125.131,76.84 125.22,76.751 125.22,76.498 125.47,76.247 v1(125.47,76.2)
  L6 w0.152: v1(114.76,50.877) 114.76,50.734 R155.1@115.492,50.002
CLKM_N: IC19.15 IC24.10 R17.2 | length 7.8
  L1 w0.152: IC19.15@110.244,40.213 110.244,39.587 110.134,39.477 110.134,38.105 R17.2@110.601,37.638 110.27,37.308 110.27,36.135 110.872,35.534 v1(111.027,35.534) ; v1(111.79,34.973) 111.866,34.973 112.293,34.546 IC24.10@112.293,34.196
  L3 w0.15: v1(111.027,35.534) 111.428,35.534 111.89,35.072 v1(111.79,34.973) v1(111.79,34.973)
  L4 w0.15: v1(111.027,35.534) v1@111.027,35.647
CLKM_P: IC19.14 IC24.9 R17.1 | length 8.6
  L1 w0.152: IC19.14@109.744,40.213 109.744,39.587 109.854,39.477 109.854,38.418 109.661,38.224 R17.1@109.661,37.638 109.991,37.308 109.991,36.019 110.573,35.437 110.573,35.346 110.839,35.081 111.214,35.081 111.56,35.427 111.994,35.427 111.994,35.422 112.598,34.818 112.598,34.741 112.793,34.546 IC24.9@112.793,34.196
CPCIS_CLK_N: C214.2 J10.17 | length 1.8
  L1 w0.152: J10.17@142.269,51.291 142.869,51.291 143.034,51.456 143.218,51.456 143.24,51.434 143.521,51.434 143.61,51.345 143.61,51.297 C214.2@143.844,51.063
CPCIS_CLK_P: C213.2 J10.15 | length 1.9
  L1 w0.152: J10.15@142.269,51.926 142.869,51.926 143.034,51.761 143.213,51.761 143.239,51.735 143.333,51.735 143.355,51.713 143.571,51.713 143.66,51.803 143.66,51.829 C213.2@143.894,52.063
DAC_OUT_SEA: R59A.1 TR1A.1 TR8A.6 | length 8.5
  L1 w0.298: R59A.1@46.39,76.431 46.39,81.488 46.667,81.765 48.692,81.765 TR1A.1@48.729,81.728 ; TR1A.1@49.444,81.413 49.489,81.368 TR8A.6@49.489,80.458
DAC_OUT_SEB: R59B.1 TR1B.1 TR8B.6 | length 9.2
  L1 w0.298: R59B.1@46.39,59.431 46.39,64.634 46.521,64.765 TR1B.1@48.714,64.765 48.775,64.765 49.454,64.086 TR8B.6@49.454,63.483
DAC_OUT_SEC: R59C.1 TR1C.1 TR8C.6 | length 9.1
  L1 w0.298: R59C.1@46.39,42.431 46.39,47.634 46.521,47.765 TR1C.1@48.714,47.765 49.163,47.316 49.163,46.799 TR8C.6@49.454,46.508
DAC_OUT_SED: R59D.1 TR1D.1 TR8D.6 | length 9.5
  L1 w0.298: R59D.1@46.39,25.431 46.39,26.542 45.794,27.138 45.794,29.868 46.66,30.734 48.044,30.734 48.075,30.765 TR1D.1@48.714,30.765 49.168,30.311 49.168,29.799 TR8D.6@49.454,29.513
DAC_OUTA_N: R8A.1 R38A.1 R78A.2 R91A.2 TR1A.4 TR8A.3 | length 26.7
  L1 w0.152: TR8A.3@52.669,77.918 52.973,77.615 53.119,77.615 TR1A.4@53.119,77.138 ; TR1A.4@53.809,76.648 53.846,76.685 55.755,76.685 55.919,76.849 R38A.1@55.919,77.954 56.618,77.954 56.844,78.18 R8A.1@56.844,78.943 57.162,79.261 57.67,79.261 v1(57.831,79.1) ; v1(60.198,80.924) 60.198,81.073 60.223,81.098 60.514,81.098 R78A.2@60.824,80.788
  L6 w0.152: v1(57.831,79.1) 58.002,79.271 58.801,79.271 59.414,78.658 59.414,77.846 58.906,77.338 57.052,77.338 56.518,77.871 56.518,83.103 57.534,84.119 58.271,84.119 58.55,83.84 58.55,81.834 59.286,81.098 59.948,81.098 v1@60.16,80.886 ; v1@60.258,80.788 R91A.2@60.824,80.788
DAC_OUTA_P: R8A.2 R54A.1 R56A.2 R79A.2 TR1A.6 TR8A.1 | length 28.7
  L1 w0.152: TR8A.1@53.144,80.613 53.144,81.063 TR1A.6@53.809,81.728 53.846,81.765 55.879,81.765 55.919,81.726 R54A.1@55.919,80.875 56.641,80.875 56.844,80.672 R8A.2@56.844,79.883 57.162,79.566 57.531,79.566 57.712,79.747 v1@57.831,79.747 ; v1(60.198,81.585) 60.198,81.429 60.223,81.403 60.514,81.403 R56A.2@60.824,81.713
  L6 w0.152: v1@57.86,79.747 58.032,79.576 58.927,79.576 59.719,78.785 59.719,77.719 59.032,77.033 56.925,77.033 56.213,77.745 56.213,83.23 57.408,84.424 58.397,84.424 58.855,83.966 58.855,81.96 59.412,81.403 59.948,81.403 v1@60.164,81.619 ; v1@60.258,81.713 R79A.2@60.824,81.713
  other v1: 57.831,79.847
DAC_OUTB_N: R8B.1 R38B.1 R78B.2 R91B.2 TR1B.4 TR8B.3 | length 24.5
  L1 w0.152: TR8B.3@52.634,60.943 52.634,60.223 TR1B.4@52.944,59.913 ; TR1B.4@53.794,59.685 55.722,59.685 55.893,59.856 55.893,60.961 56.095,60.961 56.191,61.057 56.688,61.057 56.844,61.213 R8B.1@56.844,61.943 57.162,62.261 57.67,62.261 v1(57.831,62.1) ; v1(60.198,58.42) 60.198,58.522 60.274,58.598 60.514,58.598 R78B.2@60.824,58.288
  L3 w0.15: v1(60.198,58.42) 60.23,58.452 v1@60.343,58.452
  L6 w0.152: v1(57.831,62.1) 58.002,62.271 58.907,62.271 59.026,62.152 59.026,60.77 58.652,60.396 55.894,60.396 55.274,59.775 55.274,57.78 56.214,56.84 58.6,56.84 58.69,56.929 59.211,57.45 59.211,58.104 59.705,58.598 60.02,58.598 v1(60.198,58.42) 60.258,58.36 60.258,58.288 R91B.2@60.824,58.288
DAC_OUTB_P: R8B.2 R54B.1 R56B.2 R79B.2 TR1B.6 TR8B.1 | length 23.3
  L1 w0.152: TR8B.1@52.634,63.483 52.919,63.768 TR1B.6@52.919,64.338 ; TR1B.6@53.794,64.765 55.531,64.765 55.919,64.378 55.919,63.882 56.844,62.957 R8B.2@56.844,62.883 57.162,62.566 57.531,62.566 57.712,62.747 v1@57.831,62.747 ; v1(60.198,59.08) 60.198,58.979 60.274,58.903 60.514,58.903 R56B.2@60.824,59.213
  L6 w0.152: v1@57.831,62.747 57.86,62.747 58.032,62.576 59.033,62.576 59.146,62.463 59.331,62.278 59.331,60.644 58.778,60.091 56.02,60.091 55.578,59.649 55.578,57.907 56.34,57.145 58.474,57.145 58.906,57.576 58.906,58.231 59.578,58.903 60.021,58.903 v1(60.198,59.08) 60.258,59.14 60.258,59.213 R79B.2@60.824,59.213
  other v1: 57.831,62.847
DAC_OUTC_N: R8C.1 R38C.1 R78C.2 R91C.2 TR1C.4 TR8C.3 | length 25.5
  L1 w0.152: TR8C.3@52.634,43.968 52.892,43.71 52.923,43.71 52.969,43.664 TR1C.4@52.969,43.188 ; TR1C.4@53.794,42.685 55.74,42.685 55.931,42.876 R38C.1@55.931,43.929 56.577,43.929 56.844,44.196 R8C.1@56.844,44.943 ; R8C.1@56.934,44.889 57.148,45.247 57.657,45.247 v1(57.831,45.073) ; 60.274,36.098 60.514,36.098 R78C.2@60.824,35.788
  L6 w0.152: v1(57.831,45.073) 58.005,45.247 58.826,45.247 59.026,45.047 59.026,43.981 58.55,43.505 56.129,43.505 55.35,42.726 55.35,37.664 56.92,36.093 59.893,36.093 v1(60.071,35.916) ; v1@60.258,35.788 R91C.2@60.824,35.788
DAC_OUTC_P: R8C.2 R54C.1 R56C.2 R79C.2 TR1C.6 TR8C.1 | length 25.8
  L1 w0.152: TR8C.1@52.634,46.508 52.925,46.799 53.056,46.799 53.069,46.812 TR1C.6@53.069,47.363 ; TR1C.6@53.794,47.765 55.615,47.765 55.849,47.531 55.849,46.883 55.856,46.876 R54C.1@55.931,46.876 56.553,46.876 56.844,46.585 R8C.2@56.844,45.883 57.175,45.552 57.657,45.552 v1(57.831,45.726) ; v1(60.071,36.576) 60.244,36.403 60.514,36.403 R56C.2@60.824,36.713
  L6 w0.152: v1(57.831,45.726) 58.005,45.552 58.952,45.552 59.331,45.173 59.331,43.854 58.676,43.2 56.255,43.2 55.655,42.6 55.655,37.79 57.046,36.398 59.893,36.398 v1(60.071,36.576) 60.121,36.576 60.258,36.713 R79C.2@60.824,36.713
DAC_OUTD_N: R8D.1 R38D.1 R78D.2 R91D.2 TR1D.4 TR8D.3 | length 27.6
  L1 w0.152: TR8D.3@52.769,26.913 52.987,26.913 53.23,26.669 53.23,26.452 53.794,25.888 TR1D.4@53.794,25.685 54.132,26.024 55.588,26.024 55.944,26.379 55.944,26.9 R38D.1@55.969,26.925 56.592,26.925 56.884,27.217 R8D.1@56.884,27.941 ; R8D.1@56.863,27.962 57.162,28.261 57.77,28.261 v1(57.931,28.1) ; v1(60.147,13.31) 60.269,13.31 60.274,13.305 60.258,13.288 R78D.2@60.824,13.288
  L6 w0.152: v1(57.931,28.1) 58.102,28.271 58.631,28.271 58.931,27.971 58.931,27.717 58.951,27.697 58.951,27.301 58.931,27.281 58.931,26.878 57.626,25.573 56.839,24.787 56.839,15.864 59.088,13.614 59.842,13.614 v1(60.147,13.31) ; v1@60.274,13.288 R91D.2@60.824,13.288
DAC_OUTD_P: R8D.2 R54D.1 R56D.2 R79D.2 TR1D.6 TR8D.1 | length 27.1
  L1 w0.152: TR8D.1@52.634,29.513 52.92,29.799 53.119,29.799 53.137,29.817 53.137,30.431 TR1D.6@53.369,30.663 ; TR1D.6@53.794,30.765 55.52,30.765 55.844,30.442 55.844,29.872 R54D.1@55.969,29.872 56.479,29.872 56.59,29.761 56.59,29.642 56.844,29.388 R8D.2@56.844,28.883 ; R8D.2@56.882,28.883 R8D.2@56.844,28.883 ; v1@57.931,28.747 57.762,28.578 57.443,28.578 57.431,28.566 57.162,28.566 R8D.2@56.844,28.883 ; v1@60.274,14.213 R56D.2@60.824,14.213
  L6 w0.152: v1@57.931,28.747 57.96,28.747 58.132,28.576 58.757,28.576 59.236,28.097 59.236,27.843 59.256,27.823 59.256,27.174 59.236,27.154 59.236,26.752 57.144,24.66 57.144,15.99 59.215,13.919 59.842,13.919 v1(60.147,14.224) ; v1@60.274,14.213 R79D.2@60.824,14.213
  other v1: 57.931,28.847
DAC_OUTRA_N: IC13A.51 R91A.1 | length 35
  L1 w0.152: v1@93.643,81.313 93.666,81.29 93.769,81.29 93.834,81.29 93.834,81.313 IC13A.51@93.834,81.991
  L6 w0.152: R91A.1@61.764,80.788 62.074,81.098 78.059,81.098 79.099,80.058 85.847,80.058 87.701,81.913 93.758,81.913 93.958,81.713 93.958,81.502 v1(93.769,81.313)
DAC_OUTRA_P: IC13A.50 R79A.1 | length 35.4
  L1 w0.152: IC13A.50@94.334,81.991 94.334,81.296 94.334,81.29 94.445,81.29 v1(94.451,81.296)
  L6 w0.152: R79A.1@61.764,81.713 62.074,81.403 78.185,81.403 79.225,80.363 85.72,80.363 87.575,82.218 93.884,82.218 94.263,81.839 94.263,81.485 v1(94.451,81.296)
DAC_OUTRB_N: IC13B.51 R91B.1 | length 34.9
  L1 w0.152: v1@93.643,58.813 93.666,58.79 v1@93.769,58.79 ; v1@93.77,58.79 93.781,58.801 93.834,58.853 IC13B.51@93.834,59.491
  L6 w0.152: R91B.1@61.764,58.288 62.074,58.598 78.059,58.598 79.099,57.558 85.847,57.558 87.701,59.413 93.758,59.413 93.958,59.213 93.958,59.002 v1(93.769,58.813)
DAC_OUTRB_P: IC13B.50 R79B.1 | length 35.1
  L1 w0.152: IC13B.50@94.334,59.491 94.334,58.853 94.398,58.79 94.445,58.79 v1@94.452,58.796
  L6 w0.152: R79B.1@61.764,59.213 62.074,58.903 78.185,58.903 79.225,57.863 85.72,57.863 87.575,59.718 93.884,59.718 94.263,59.339 94.263,58.985
  other v1: 94.469,58.796
DAC_OUTRC_N: IC13C.51 R91C.1 | length 34.9
  L1 w0.152: v1@93.732,36.313 93.75,36.295 93.755,36.29 93.769,36.29 93.834,36.29 93.834,36.313 IC13C.51@93.834,36.991
  L6 w0.152: R91C.1@61.764,35.788 62.074,36.098 78.059,36.098 79.099,35.058 85.847,35.058 87.701,36.913 93.758,36.913 93.958,36.713 93.958,36.502 v1(93.769,36.313)
DAC_OUTRC_P: IC13C.50 R79C.1 | length 35.4
  L1 w0.152: v1@94.334,36.187 94.334,36.29 94.334,36.296 IC13C.50@94.334,36.991
  L6 w0.152: R79C.1@61.764,36.713 62.074,36.403 78.185,36.403 79.225,35.363 85.72,35.363 87.575,37.218 93.884,37.218 94.263,36.839 94.263,36.485 v1(94.451,36.296)
DAC_OUTRD_N: IC13D.51 R91D.1 | length 34.9
  L1 w0.152: v1@93.732,13.813 93.75,13.795 93.755,13.79 93.769,13.79 93.834,13.79 93.834,13.813 IC13D.51@93.834,14.491
  L6 w0.152: R91D.1@61.764,13.288 62.074,13.598 78.059,13.598 79.099,12.558 85.847,12.558 87.701,14.413 93.758,14.413 93.958,14.213 93.958,14.002 v1(93.769,13.813)
DAC_OUTRD_P: IC13D.50 R79D.1 | length 35.4
  L1 w0.152: v1@94.334,13.687 94.334,13.79 94.334,13.796 IC13D.50@94.334,14.491
  L6 w0.152: R79D.1@61.764,14.213 62.074,13.903 78.185,13.903 79.225,12.863 85.72,12.863 87.575,14.718 93.884,14.718 94.263,14.339 94.263,13.985 v1(94.451,13.796)
DDS0_SYNC_IN_N: IC2A.8 IC9.4 | length 163.9
  L1 w0.152: v1(69.936,71.064) 69.944,71.056 IC2A.8@69.944,69.841 ; v1(140.428,17.292) 140.428,17.386 140.585,17.543 140.585,18.198 140.491,18.292 IC9.4@140.491,18.605
  L3 w0.15: v1(125.899,85.063) 125.947,85.014 126.222,85.014 126.376,84.86 126.766,84.86 126.777,84.871 131.62,84.871 132.95,83.541 136.067,83.541 139.293,80.315 143.758,80.315 148.21,75.863 148.21,56.527 146.87,55.187 146.87,54.161 147.438,53.593 147.438,52.093 146.87,51.525 146.87,25.777 146.575,25.483 146.575,24.469 144.736,22.629 144.53,22.629 140.581,18.681 140.581,17.54 140.428,17.387 v1(140.428,17.292)
  L4 w0.15: v1(69.936,71.064) 69.871,70.998 69.63,70.998 69.48,70.848 69.48,70.68 70.628,69.533 71.305,69.533 73.296,67.541 76.501,67.541 76.67,67.541 76.758,67.629 76.758,67.642 76.945,67.83 77.869,67.83 78.056,67.642 78.056,67.629 78.144,67.541 81.383,67.541 95.048,67.541 95.214,67.707 109.794,67.707 110.574,68.487 113.6,68.487 113.854,68.233 114.071,68.233 v1(114.138,68.166)
  L6 w0.152: v1(114.138,68.166) 114.072,68.232 113.844,68.232 113.686,68.39 113.686,71.324 116.224,73.862 116.224,80.268 121.444,85.488 125.609,85.488 125.781,85.317
DDS0_SYNC_IN_P: IC2A.7 IC9.5 | length 166.4
  L1 w0.152: v1(69.436,71.498) 69.406,71.468 69.406,70.752 69.444,70.715 IC2A.7@69.444,69.841 ; IC9.5@140.991,18.605 140.991,18.292 140.897,18.198 140.897,17.543 141.055,17.386 v1(141.055,17.292)
  L3 w0.15: v1(126.215,85.604) 126.215,85.51 126.336,85.389 126.336,85.353 126.509,85.18 126.633,85.18 126.645,85.191 131.752,85.191 133.083,83.861 136.199,83.861 139.425,80.635 143.891,80.635 148.53,75.995 148.53,56.394 147.19,55.054 147.19,54.294 147.758,53.726 147.758,51.96 147.19,51.392 147.19,25.645 146.895,25.35 146.895,24.336 144.868,22.309 144.662,22.309 140.901,18.548 140.901,17.54 141.055,17.387 v1(141.055,17.292)
  L4 w0.15: v1(69.436,71.498) 69.371,71.432 69.371,71.192 69.16,70.981 69.16,70.548 70.495,69.213 71.172,69.213 73.164,67.221 76.501,67.221 76.803,67.221 77.078,67.497 77.078,67.51 77.736,67.51 77.736,67.497 78.011,67.221 81.383,67.221 95.181,67.221 95.346,67.387 109.926,67.387 110.706,68.167 113.467,68.167 113.628,68.006 113.628,67.789 v1(113.695,67.722)
  L6 w0.152: v1(113.695,67.722) 113.628,67.789 113.628,68.017 113.381,68.264 113.381,71.45 115.919,73.988 115.919,80.394 121.318,85.793 125.7,85.793 125.866,85.627 126.193,85.627 v1(126.215,85.604)
DDS0_SYNC_OUT_N: IC2A.10 IC9.15 R68.1 | length 161.6
  L1 w0.152: IC2A.10@70.944,69.841 70.944,70.867 70.846,70.965 70.846,71.939 71.018,72.111 v1@71.018,72.339 ; IC9.15@143.341,22.455 144.017,22.455 144.155,22.592 144.155,22.675 R68.1@144.741,22.675 145.071,22.345 146.589,22.345 v1(146.79,22.143)
  L3 w0.15: v1(126.695,86.981) 126.762,86.914 126.762,86.722 126.939,86.546 138.621,86.546 140.038,85.128 140.038,84.363 141.715,82.686 144.741,82.686 150.164,77.263 150.164,68.419 149.486,67.741 149.486,66.666 149.658,66.494 149.658,54.344 148.666,53.353 148.666,51.631 148.22,51.185 148.22,24.249 146.395,22.424 146.395,22.314 146.499,22.21 146.723,22.21 v1(146.79,22.143)
  L4 w0.15: v1(71.043,72.414) 71.043,72.334 70.861,72.152 70.861,71.518 72.403,69.976 79.697,69.976 80.026,70.305 89.038,70.305 89.457,69.886 104.386,69.886 105.388,70.888 105.388,73.823 106.388,74.823 113.451,74.823 113.628,75 113.628,75.217 v1(113.695,75.284)
  L6 w0.152: v1(113.695,75.284) 113.761,75.35 113.989,75.35 114.339,75.7 114.339,80.373 121.695,87.728 125.746,87.728 126.427,87.047 126.629,87.047 v1(126.695,86.981)
DDS0_SYNC_OUT_P: IC2A.9 IC9.14 R68.2 | length 161.6
  L1 w0.152: v1(70.358,72.414) 70.358,72.162 70.51,72.009 ; IC2A.9@70.444,69.841 70.444,70.867 70.542,70.965 70.542,72.009 ; IC9.14@143.341,21.955 144.017,21.955 144.155,21.817 144.155,21.735 R68.2@144.741,21.735 145.071,22.065 145.981,22.065 v1(146.346,21.7)
  L3 w0.15: v1(126.239,86.551) 126.294,86.496 126.536,86.496 126.807,86.226 138.488,86.226 139.718,84.996 139.718,84.231 141.583,82.366 144.608,82.366 149.844,77.13 149.844,68.551 149.166,67.874 149.166,66.534 149.338,66.361 149.338,54.477 148.346,53.485 148.346,51.763 147.9,51.317 147.9,24.381 146.085,22.566 146.085,22.185 146.279,21.991 146.279,21.767 v1(146.346,21.7)
  L4 w0.15: v1(70.358,72.414) 70.358,72.334 70.541,72.152 70.541,71.386 72.27,69.656 79.83,69.656 80.159,69.985 88.905,69.985 89.324,69.566 104.519,69.566 105.708,70.755 105.708,73.69 106.521,74.503 113.583,74.503 113.854,74.773 114.071,74.773 v1(114.138,74.84)
  L6 w0.152: v1(114.138,74.84) 114.205,74.907 114.205,75.135 114.644,75.574 114.644,80.247 121.821,87.423 125.62,87.423 126.186,86.857 126.186,86.604 v1(126.239,86.551)
DDS1_SYNC_IN_N: IC2B.8 IC9.31 | length 165.6
  L1 w0.152: IC2B.8@69.944,47.341 69.944,48.367 69.846,48.465 69.846,49.188 70.041,49.383 v1(70.041,49.442) ; v1(136.692,20.018) 136.755,19.955 IC9.31@138.141,19.955
  L3 w0.15: v1(113.998,46.096) 114.093,46.096 114.25,45.939 114.352,45.939 114.627,45.663 114.627,44.322 114.362,44.057 114.362,41.599 115.657,40.303 115.657,30.535 115.423,30.301 115.426,30.298 115.426,19.359 116.039,18.746 119.546,18.746 119.699,18.9 v1(119.794,18.9)
  L4 w0.15: v1(70.041,49.442) 70.041,49.35 69.871,49.179 69.871,48.342 68.133,46.604 65.999,46.604 63,49.603 58.745,49.603 57.954,48.812 57.954,46.856 60.062,44.748 71.355,44.748 71.524,44.748 71.611,44.836 71.611,47.101 71.799,47.288 72.722,47.288 72.909,47.101 72.909,44.497 73.567,44.497 73.567,47.101 73.755,47.288 74.678,47.288 74.865,47.101 74.865,43.135 75.523,43.135 75.523,47.101 75.711,47.288 76.634,47.288 76.821,47.101 76.821,43.036 77.479,43.036 77.479,47.101 77.667,47.288 78.59,47.288 78.777,47.101 78.777,42.208 79.435,42.208 79.435,47.101 79.623,47.288 80.546,47.288 80.733,47.101 80.733,44.836 80.821,44.748 81.799,44.748 86.113,44.748 86.451,44.41 86.456,44.415 90.019,44.415 90.342,44.738 100.282,44.738 101.226,45.682 105.123,45.682 105.449,45.356 108.295,45.356 109.061,46.122 113.553,46.122 113.611,46.064 113.967,46.064 v1(113.998,46.096) ; v1(119.794,18.9) 119.889,18.9 120.042,18.746 134.053,18.746 135.171,19.865 136.444,19.865 136.597,20.018 v1(136.692,20.018)
DDS1_SYNC_IN_P: IC2B.7 IC9.32 | length 166.2
  L1 w0.152: v1(69.381,49.442) 69.542,49.281 69.542,48.465 69.444,48.367 IC2B.7@69.444,47.341 ; v1(136.692,19.391) 136.755,19.455 IC9.32@138.141,19.455
  L3 w0.15: v1(113.744,45.461) 113.839,45.461 113.997,45.619 114.219,45.619 114.307,45.531 114.307,44.455 114.042,44.19 114.042,41.466 115.337,40.171 115.337,30.668 115.103,30.434 115.103,30.168 115.106,30.166 115.106,19.227 115.906,18.426 119.546,18.426 119.699,18.273 v1(119.794,18.273)
  L4 w0.15: v1(69.381,49.442) 69.381,49.35 69.551,49.179 69.551,48.474 68,46.924 66.132,46.924 63.133,49.923 58.613,49.923 57.634,48.945 57.634,46.724 59.93,44.428 71.355,44.428 71.656,44.428 71.931,44.704 71.931,46.968 72.589,46.968 72.589,44.365 72.777,44.177 73.7,44.177 73.887,44.365 73.887,46.968 74.545,46.968 74.545,43.003 74.733,42.815 75.656,42.815 75.843,43.003 75.843,46.968 76.501,46.968 76.501,42.903 76.689,42.716 77.612,42.716 77.799,42.903 77.799,46.968 78.457,46.968 78.457,42.076 78.645,41.888 79.568,41.888 79.755,42.076 79.755,46.968 80.413,46.968 80.413,44.704 80.689,44.428 81.799,44.428 85.98,44.428 86.319,44.09 86.584,44.09 86.589,44.095 90.151,44.095 90.482,44.426 90.49,44.418 100.415,44.418 101.358,45.362 104.99,45.362 105.316,45.036 108.428,45.036 109.194,45.802 113.421,45.802 113.744,45.478 v1(113.744,45.461) ; v1(119.794,18.273) 119.889,18.273 120.042,18.426 134.185,18.426 135.304,19.545 136.444,19.545 136.597,19.391 v1(136.692,19.391)
DDS2_SYNC_IN_N: IC2C.8 IC9.25 | length 162.6
  L1 w0.152: IC2C.8@69.944,24.841 69.944,26.561 v1(70.016,26.633) ; v1(117.337,22.099) 117.403,22.033 117.403,21.81 117.639,21.574 122.699,21.574 123.127,21.146 123.253,21.146 123.354,21.247 123.354,21.469 v1(123.42,21.535) ; v1@137.474,22.955 IC9.25@138.141,22.955